# Altium PCB K601-6252双模带屏 VER 1.1 2026 10 16.PcbDoc (part 7 of 12)
Units mm, origin at the board's own origin, x right, y up, seen from the top; angles counter-clockwise.
Board outline 75.02 x 25.73 mm, 2 copper layers (Top Layer, Bottom Layer); 43 components, 67 nets, 219 pads, 157 vias.
Unrouted connection lines stored in the file: 1.
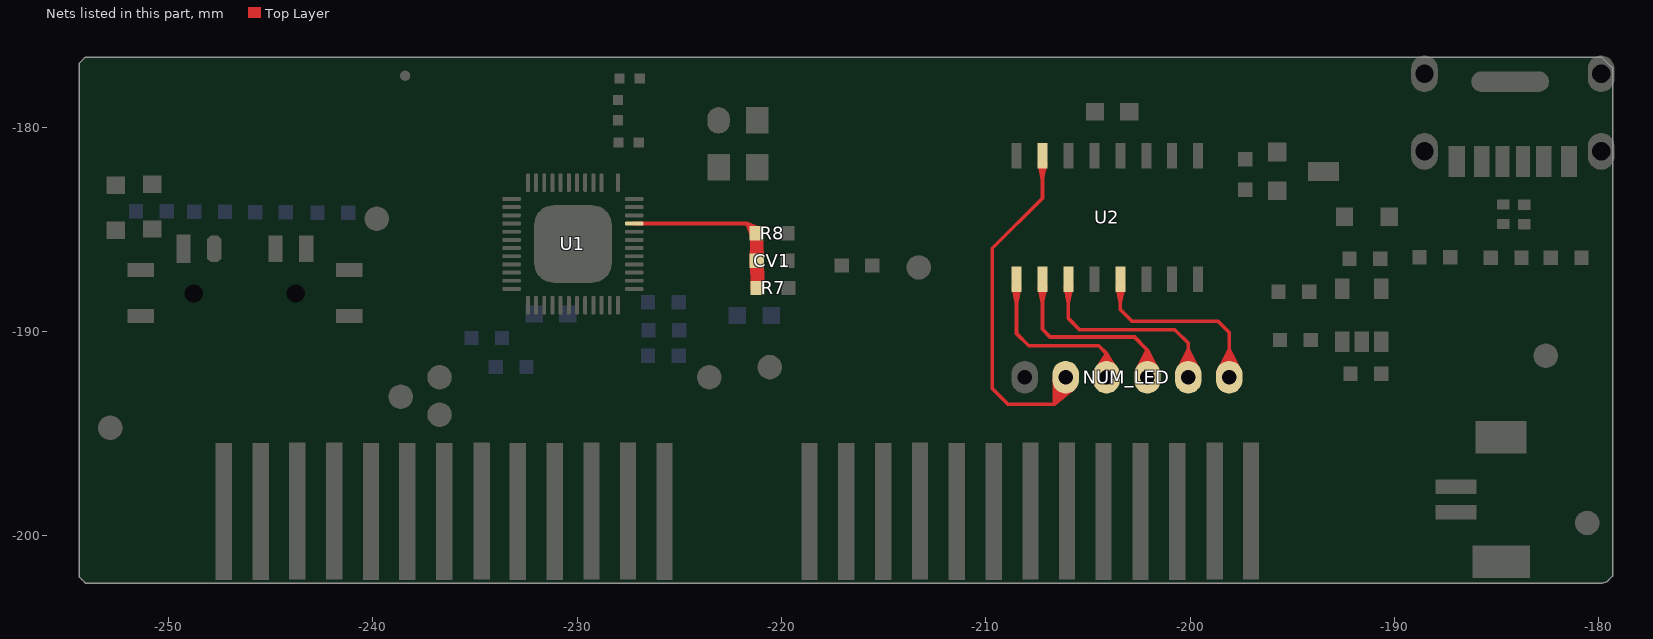
[diagram p7: the nets of this part, all layers, seen from the top]

## Via types
v1: diameter 0.6, hole 0.4, Top Layer to Bottom Layer, tented both sides, 154 vias
v2: diameter 0.6, hole 0.4, Top Layer to Bottom Layer, 3 vias

## Nets (pads, with @x,y where several pads share a name; then routed paths per layer and width w, separated by ;. In a path a pad name is that pad's centre, name@x,y a point inside that pad or via, vN(x,y) a via of type N, cw(c..) or ccw(c..) an arc to the next point about the centre after c; other vN are vias at no path point) (continued)
LED1: (continued)
  Top Layer w0.18: -206.629,-193.542 NUM_LED.5@-206.455,-192.284 ; -206.629,-193.542 NUM_LED.5@-205.917,-192.49 ; -206.629,-193.542 NUM_LED.5@-206.278,-192.321 ; -206.629,-193.542 NUM_LED.5@-206.091,-192.392 ; -206.629,-193.542 NUM_LED.5@-205.649,-192.735 ; -206.629,-193.542 NUM_LED.5@-205.775,-192.602 ; -206.629,-193.542 NUM_LED.5@-206.455,-192.284 ; -206.629,-193.542 NUM_LED.5@-205.917,-192.49 ; -206.629,-193.542 NUM_LED.5@-206.278,-192.321 ; -206.629,-193.542 NUM_LED.5@-206.091,-192.392 ; -206.629,-193.542 NUM_LED.5@-205.649,-192.735 ; -206.629,-193.542 NUM_LED.5@-205.775,-192.602 ; -206.629,-193.542 NUM_LED.5@-206.455,-192.284 ; -206.629,-193.542 NUM_LED.5@-205.917,-192.49 ; -206.629,-193.542 NUM_LED.5@-206.278,-192.321 ; -206.629,-193.542 NUM_LED.5@-206.091,-192.392 ; -206.629,-193.542 NUM_LED.5@-205.649,-192.735 ; -206.629,-193.542 NUM_LED.5@-205.775,-192.602 ; -206.629,-193.542 NUM_LED.5@-206.455,-192.284 ; -206.629,-193.542 NUM_LED.5@-205.917,-192.49 ; -206.629,-193.542 NUM_LED.5@-206.278,-192.321 ; -206.629,-193.542 NUM_LED.5@-206.091,-192.392 ; -206.629,-193.542 NUM_LED.5@-205.649,-192.735 ; -206.629,-193.542 NUM_LED.5@-205.775,-192.602 ; -206.629,-193.542 NUM_LED.5@-206.455,-192.284 ; -206.629,-193.542 NUM_LED.5@-205.917,-192.49 ; -206.629,-193.542 NUM_LED.5@-206.278,-192.321 ; -206.629,-193.542 NUM_LED.5@-206.091,-192.392 ; -206.629,-193.542 NUM_LED.5@-205.649,-192.735 ; -206.629,-193.542 NUM_LED.5@-205.775,-192.602 ; -206.629,-193.542 NUM_LED.5@-206.455,-192.284 ; -206.629,-193.542 NUM_LED.5@-205.917,-192.49 ; -206.629,-193.542 NUM_LED.5@-206.278,-192.321 ; -206.629,-193.542 NUM_LED.5@-206.091,-192.392 ; -206.629,-193.542 NUM_LED.5@-205.649,-192.735 ; -206.629,-193.542 NUM_LED.5@-205.775,-192.602 ; -206.629,-193.542 NUM_LED.5@-206.455,-192.284 ; -206.629,-193.542 NUM_LED.5@-205.917,-192.49 ; -206.629,-193.542 NUM_LED.5@-206.278,-192.321 ; -206.629,-193.542 NUM_LED.5@-206.091,-192.392 ; -206.629,-193.542 NUM_LED.5@-205.649,-192.735 ; -206.629,-193.542 NUM_LED.5@-205.775,-192.602 ; -206.629,-193.542 NUM_LED.5@-206.455,-192.284 ; -206.629,-193.542 NUM_LED.5@-205.917,-192.49 ; -206.629,-193.542 NUM_LED.5@-206.278,-192.321 ; -206.629,-193.542 NUM_LED.5@-206.091,-192.392 ; -206.629,-193.542 NUM_LED.5@-205.649,-192.735 ; -206.629,-193.542 NUM_LED.5@-205.775,-192.602 ; -206.629,-193.542 NUM_LED.5@-206.455,-192.284 ; -206.629,-193.542 NUM_LED.5@-205.917,-192.49 ; -206.629,-193.542 NUM_LED.5@-206.278,-192.321 ; -206.629,-193.542 NUM_LED.5@-206.091,-192.392 ; -206.629,-193.541 NUM_LED.5@-205.649,-192.735 ; -206.629,-193.541 NUM_LED.5@-205.775,-192.602 ; -206.629,-193.541 NUM_LED.5@-206.455,-192.284 ; -206.629,-193.541 NUM_LED.5@-205.917,-192.49 ; -206.629,-193.541 NUM_LED.5@-206.278,-192.321 ; -206.629,-193.541 NUM_LED.5@-206.091,-192.392
LED2: NUM_LED.4 U2.9 | length 84
  Top Layer w0.18: U2.9@-208.495,-187.448 -208.495,-190.103 -207.9,-190.698 -204.475,-190.698 -204.091,-191.082 ; NUM_LED.4@-204.091,-192.242 -204.091,-191.082 ; U2.9@-208.649,-187.843 -208.495,-188.613 ; U2.9@-208.649,-187.843 -208.495,-188.613 ; U2.9@-208.649,-187.843 -208.495,-188.613 ; U2.9@-208.649,-187.843 -208.495,-188.613 ; U2.9@-208.649,-187.843 -208.495,-188.613 ; -208.495,-188.613 U2.9@-208.341,-187.843 ; -208.495,-188.613 U2.9@-208.495,-187.828 ; -208.495,-188.613 U2.9@-208.341,-187.843 ; -208.495,-188.613 U2.9@-208.495,-187.828 ; -208.495,-188.613 U2.9@-208.341,-187.843 ; -208.495,-188.613 U2.9@-208.495,-187.828 ; -208.495,-188.613 U2.9@-208.341,-187.843 ; -208.495,-188.613 U2.9@-208.495,-187.828 ; -208.495,-188.613 U2.9@-208.341,-187.843 ; -208.495,-188.613 U2.9@-208.495,-187.828 ; NUM_LED.4@-204.629,-191.936 -204.091,-191.082 ; NUM_LED.4@-204.629,-191.936 -204.091,-191.082 ; NUM_LED.4@-204.629,-191.936 -204.091,-191.082 ; NUM_LED.4@-204.629,-191.936 -204.091,-191.082 ; NUM_LED.4@-204.629,-191.936 -204.091,-191.082 ; NUM_LED.4@-204.629,-191.936 -204.091,-191.082 ; NUM_LED.4@-204.629,-191.936 -204.091,-191.082 ; NUM_LED.4@-204.629,-191.936 -204.091,-191.082 ; NUM_LED.4@-204.629,-191.936 -204.091,-191.082 ; NUM_LED.4@-204.464,-192.02 -204.091,-191.082 ; NUM_LED.4@-204.464,-192.02 -204.091,-191.082 ; NUM_LED.4@-204.464,-192.02 -204.091,-191.082 ; NUM_LED.4@-204.464,-192.02 -204.091,-191.082 ; NUM_LED.4@-204.464,-192.02 -204.091,-191.082 ; NUM_LED.4@-204.464,-192.02 -204.091,-191.082 ; NUM_LED.4@-204.464,-192.02 -204.091,-191.082 ; NUM_LED.4@-204.464,-192.02 -204.091,-191.082 ; NUM_LED.4@-204.464,-192.02 -204.091,-191.082 ; NUM_LED.4@-204.29,-192.072 -204.091,-191.082 ; NUM_LED.4@-204.29,-192.072 -204.091,-191.082 ; NUM_LED.4@-204.29,-192.072 -204.091,-191.082 ; NUM_LED.4@-204.29,-192.072 -204.091,-191.082 ; NUM_LED.4@-204.29,-192.072 -204.091,-191.082 ; NUM_LED.4@-204.29,-192.072 -204.091,-191.082 ; NUM_LED.4@-204.29,-192.072 -204.091,-191.082 ; NUM_LED.4@-204.29,-192.072 -204.091,-191.082 ; NUM_LED.4@-204.29,-192.072 -204.091,-191.082 ; NUM_LED.4@-204.091,-192.092 -204.091,-191.082 ; NUM_LED.4@-204.091,-192.092 -204.091,-191.082 ; NUM_LED.4@-204.091,-192.092 -204.091,-191.082 ; NUM_LED.4@-204.091,-192.092 -204.091,-191.082 ; NUM_LED.4@-204.091,-192.092 -204.091,-191.082 ; NUM_LED.4@-204.091,-192.092 -204.091,-191.082 ; NUM_LED.4@-204.091,-192.092 -204.091,-191.082 ; NUM_LED.4@-204.091,-192.092 -204.091,-191.082 ; NUM_LED.4@-204.091,-192.092 -204.091,-191.082 ; -204.091,-191.082 NUM_LED.4@-203.553,-191.936 ; -204.091,-191.082 NUM_LED.4@-203.718,-192.02 ; -204.091,-191.082 NUM_LED.4@-203.892,-192.072 ; -204.091,-191.082 NUM_LED.4@-203.553,-191.936 ; -204.091,-191.082 NUM_LED.4@-203.718,-192.02 ; -204.091,-191.082 NUM_LED.4@-203.892,-192.072 ; -204.091,-191.082 NUM_LED.4@-203.553,-191.936 ; -204.091,-191.082 NUM_LED.4@-203.718,-192.02 ; -204.091,-191.082 NUM_LED.4@-203.892,-192.072 ; -204.091,-191.082 NUM_LED.4@-203.553,-191.936 ; -204.091,-191.082 NUM_LED.4@-203.718,-192.02 ; -204.091,-191.082 NUM_LED.4@-203.892,-192.072 ; -204.091,-191.082 NUM_LED.4@-203.553,-191.936 ; -204.091,-191.082 NUM_LED.4@-203.718,-192.02 ; -204.091,-191.082 NUM_LED.4@-203.892,-192.072 ; -204.091,-191.082 NUM_LED.4@-203.553,-191.936 ; -204.091,-191.082 NUM_LED.4@-203.718,-192.02 ; -204.091,-191.082 NUM_LED.4@-203.892,-192.072 ; -204.091,-191.082 NUM_LED.4@-203.553,-191.936 ; -204.091,-191.082 NUM_LED.4@-203.718,-192.02 ; -204.091,-191.082 NUM_LED.4@-203.892,-192.072 ; -204.091,-191.082 NUM_LED.4@-203.553,-191.936 ; -204.091,-191.082 NUM_LED.4@-203.718,-192.02 ; -204.091,-191.082 NUM_LED.4@-203.892,-192.072 ; -204.091,-191.082 NUM_LED.4@-203.553,-191.936 ; -204.091,-191.082 NUM_LED.4@-203.718,-192.02 ; -204.091,-191.082 NUM_LED.4@-203.892,-192.072
LED3: NUM_LED.3 U2.10 | length 95.8
  Top Layer w0.18: U2.10@-207.225,-187.448 -207.225,-189.899 -206.85,-190.274 -202.722,-190.274 -202.091,-190.905 ; NUM_LED.3@-202.091,-192.242 -202.091,-190.905 ; U2.10@-207.379,-187.843 -207.225,-188.613 ; U2.10@-207.379,-187.843 -207.225,-188.613 ; U2.10@-207.379,-187.843 -207.225,-188.613 ; U2.10@-207.379,-187.843 -207.225,-188.613 ; U2.10@-207.379,-187.843 -207.225,-188.613 ; -207.225,-188.613 U2.10@-207.071,-187.843 ; -207.225,-188.613 U2.10@-207.225,-187.828 ; -207.225,-188.613 U2.10@-207.071,-187.843 ; -207.225,-188.613 U2.10@-207.225,-187.828 ; -207.225,-188.613 U2.10@-207.071,-187.843 ; -207.225,-188.613 U2.10@-207.225,-187.828 ; -207.225,-188.613 U2.10@-207.071,-187.843 ; -207.225,-188.613 U2.10@-207.225,-187.828 ; -207.225,-188.613 U2.10@-207.071,-187.843 ; -207.225,-188.613 U2.10@-207.225,-187.828 ; NUM_LED.3@-202.635,-191.959 -202.091,-190.905 ; NUM_LED.3@-202.635,-191.959 -202.091,-190.905 ; NUM_LED.3@-202.635,-191.959 -202.091,-190.905 ; NUM_LED.3@-202.635,-191.959 -202.091,-190.905 ; NUM_LED.3@-202.635,-191.959 -202.091,-190.905 ; NUM_LED.3@-202.635,-191.959 -202.091,-190.905 ; NUM_LED.3@-202.635,-191.959 -202.091,-190.905 ; NUM_LED.3@-202.635,-191.959 -202.091,-190.905 ; NUM_LED.3@-202.635,-191.959 -202.091,-190.905 ; NUM_LED.3@-202.466,-192.031 -202.091,-190.905 ; NUM_LED.3@-202.466,-192.031 -202.091,-190.905 ; NUM_LED.3@-202.466,-192.031 -202.091,-190.905 ; NUM_LED.3@-202.466,-192.031 -202.091,-190.905 ; NUM_LED.3@-202.466,-192.031 -202.091,-190.905 ; NUM_LED.3@-202.466,-192.031 -202.091,-190.905 ; NUM_LED.3@-202.466,-192.031 -202.091,-190.905 ; NUM_LED.3@-202.466,-192.031 -202.091,-190.905 ; NUM_LED.3@-202.466,-192.031 -202.091,-190.905 ; NUM_LED.3@-202.29,-192.075 -202.091,-190.905 ; NUM_LED.3@-202.29,-192.075 -202.091,-190.905 ; NUM_LED.3@-202.29,-192.075 -202.091,-190.905 ; NUM_LED.3@-202.29,-192.075 -202.091,-190.905 ; NUM_LED.3@-202.29,-192.075 -202.091,-190.905 ; NUM_LED.3@-202.29,-192.075 -202.091,-190.905 ; NUM_LED.3@-202.29,-192.075 -202.091,-190.905 ; NUM_LED.3@-202.29,-192.075 -202.091,-190.905 ; NUM_LED.3@-202.29,-192.075 -202.091,-190.905 ; NUM_LED.3@-202.091,-192.092 -202.091,-190.905 ; NUM_LED.3@-202.091,-192.092 -202.091,-190.905 ; NUM_LED.3@-202.091,-192.092 -202.091,-190.905 ; NUM_LED.3@-202.091,-192.092 -202.091,-190.905 ; NUM_LED.3@-202.091,-192.092 -202.091,-190.905 ; NUM_LED.3@-202.091,-192.092 -202.091,-190.905 ; NUM_LED.3@-202.091,-192.092 -202.091,-190.905 ; NUM_LED.3@-202.091,-192.092 -202.091,-190.905 ; NUM_LED.3@-202.091,-192.092 -202.091,-190.905 ; -202.091,-190.905 NUM_LED.3@-201.547,-191.959 ; -202.091,-190.905 NUM_LED.3@-201.716,-192.031 ; -202.091,-190.905 NUM_LED.3@-201.892,-192.075 ; -202.091,-190.905 NUM_LED.3@-201.547,-191.959 ; -202.091,-190.905 NUM_LED.3@-201.716,-192.031 ; -202.091,-190.905 NUM_LED.3@-201.892,-192.075 ; -202.091,-190.905 NUM_LED.3@-201.547,-191.959 ; -202.091,-190.905 NUM_LED.3@-201.716,-192.031 ; -202.091,-190.905 NUM_LED.3@-201.892,-192.075 ; -202.091,-190.905 NUM_LED.3@-201.547,-191.959 ; -202.091,-190.905 NUM_LED.3@-201.716,-192.031 ; -202.091,-190.905 NUM_LED.3@-201.892,-192.075 ; -202.091,-190.905 NUM_LED.3@-201.547,-191.959 ; -202.091,-190.905 NUM_LED.3@-201.716,-192.031 ; -202.091,-190.905 NUM_LED.3@-201.892,-192.075 ; -202.091,-190.905 NUM_LED.3@-201.547,-191.959 ; -202.091,-190.905 NUM_LED.3@-201.716,-192.031 ; -202.091,-190.905 NUM_LED.3@-201.892,-192.075 ; -202.091,-190.905 NUM_LED.3@-201.547,-191.959 ; -202.091,-190.905 NUM_LED.3@-201.716,-192.031 ; -202.091,-190.905 NUM_LED.3@-201.892,-192.075 ; -202.091,-190.905 NUM_LED.3@-201.547,-191.959 ; -202.091,-190.905 NUM_LED.3@-201.716,-192.031 ; -202.091,-190.905 NUM_LED.3@-201.892,-192.075 ; -202.091,-190.905 NUM_LED.3@-201.547,-191.959 ; -202.091,-190.905 NUM_LED.3@-201.716,-192.031 ; -202.091,-190.905 NUM_LED.3@-201.892,-192.075
LED4: NUM_LED.2 U2.11 | length 96.7
  Top Layer w0.18: U2.11@-205.955,-187.448 -205.955,-189.368 -205.408,-189.914 -200.749,-189.914 -200.091,-190.573 NUM_LED.2@-200.091,-192.242 ; U2.11@-206.109,-187.843 -205.955,-188.613 ; U2.11@-206.109,-187.843 -205.955,-188.613 ; U2.11@-206.109,-187.843 -205.955,-188.613 ; U2.11@-206.109,-187.843 -205.955,-188.613 ; U2.11@-206.109,-187.843 -205.955,-188.613 ; -205.955,-188.613 U2.11@-205.801,-187.843 ; -205.955,-188.613 U2.11@-205.955,-187.828 ; -205.955,-188.613 U2.11@-205.801,-187.843 ; -205.955,-188.613 U2.11@-205.955,-187.828 ; -205.955,-188.613 U2.11@-205.801,-187.843 ; -205.955,-188.613 U2.11@-205.955,-187.828 ; -205.955,-188.613 U2.11@-205.801,-187.843 ; -205.955,-188.613 U2.11@-205.955,-187.828 ; -205.955,-188.613 U2.11@-205.801,-187.843 ; -205.955,-188.613 U2.11@-205.955,-187.828 ; NUM_LED.2@-200.635,-191.96 -200.091,-190.902 ; NUM_LED.2@-200.635,-191.96 -200.091,-190.902 ; NUM_LED.2@-200.635,-191.96 -200.091,-190.902 ; NUM_LED.2@-200.635,-191.96 -200.091,-190.902 ; NUM_LED.2@-200.635,-191.96 -200.091,-190.902 ; NUM_LED.2@-200.635,-191.96 -200.091,-190.902 ; NUM_LED.2@-200.635,-191.96 -200.091,-190.902 ; NUM_LED.2@-200.635,-191.96 -200.091,-190.902 ; NUM_LED.2@-200.635,-191.96 -200.091,-190.902 ; NUM_LED.2@-200.466,-192.031 -200.091,-190.902 ; NUM_LED.2@-200.466,-192.031 -200.091,-190.902 ; NUM_LED.2@-200.466,-192.031 -200.091,-190.902 ; NUM_LED.2@-200.466,-192.031 -200.091,-190.902 ; NUM_LED.2@-200.466,-192.031 -200.091,-190.902 ; NUM_LED.2@-200.466,-192.031 -200.091,-190.902 ; NUM_LED.2@-200.466,-192.031 -200.091,-190.902 ; NUM_LED.2@-200.466,-192.031 -200.091,-190.902 ; NUM_LED.2@-200.466,-192.031 -200.091,-190.902 ; NUM_LED.2@-200.29,-192.075 -200.091,-190.902 ; NUM_LED.2@-200.29,-192.075 -200.091,-190.902 ; NUM_LED.2@-200.29,-192.075 -200.091,-190.902 ; NUM_LED.2@-200.29,-192.075 -200.091,-190.902 ; NUM_LED.2@-200.29,-192.075 -200.091,-190.902 ; NUM_LED.2@-200.29,-192.075 -200.091,-190.902 ; NUM_LED.2@-200.29,-192.075 -200.091,-190.902 ; NUM_LED.2@-200.29,-192.075 -200.091,-190.902 ; NUM_LED.2@-200.29,-192.075 -200.091,-190.902 ; NUM_LED.2@-200.091,-192.092 -200.091,-190.902 ; NUM_LED.2@-200.091,-192.092 -200.091,-190.902 ; NUM_LED.2@-200.091,-192.092 -200.091,-190.902 ; NUM_LED.2@-200.091,-192.092 -200.091,-190.902 ; NUM_LED.2@-200.091,-192.092 -200.091,-190.902 ; NUM_LED.2@-200.091,-192.092 -200.091,-190.902 ; NUM_LED.2@-200.091,-192.092 -200.091,-190.902 ; NUM_LED.2@-200.091,-192.092 -200.091,-190.902 ; NUM_LED.2@-200.091,-192.092 -200.091,-190.902 ; -200.091,-190.902 NUM_LED.2@-199.547,-191.96 ; -200.091,-190.902 NUM_LED.2@-199.716,-192.031 ; -200.091,-190.902 NUM_LED.2@-199.892,-192.075 ; -200.091,-190.902 NUM_LED.2@-199.547,-191.96 ; -200.091,-190.902 NUM_LED.2@-199.716,-192.031 ; -200.091,-190.902 NUM_LED.2@-199.892,-192.075 ; -200.091,-190.902 NUM_LED.2@-199.547,-191.96 ; -200.091,-190.902 NUM_LED.2@-199.716,-192.031 ; -200.091,-190.902 NUM_LED.2@-199.892,-192.075 ; -200.091,-190.902 NUM_LED.2@-199.547,-191.96 ; -200.091,-190.902 NUM_LED.2@-199.716,-192.031 ; -200.091,-190.902 NUM_LED.2@-199.892,-192.075 ; -200.091,-190.902 NUM_LED.2@-199.547,-191.96 ; -200.091,-190.902 NUM_LED.2@-199.716,-192.031 ; -200.091,-190.902 NUM_LED.2@-199.892,-192.075 ; -200.091,-190.902 NUM_LED.2@-199.547,-191.96 ; -200.091,-190.902 NUM_LED.2@-199.716,-192.031 ; -200.091,-190.902 NUM_LED.2@-199.892,-192.075 ; -200.091,-190.902 NUM_LED.2@-199.547,-191.96 ; -200.091,-190.902 NUM_LED.2@-199.716,-192.031 ; -200.091,-190.902 NUM_LED.2@-199.892,-192.075 ; -200.091,-190.902 NUM_LED.2@-199.547,-191.96 ; -200.091,-190.902 NUM_LED.2@-199.716,-192.031 ; -200.091,-190.902 NUM_LED.2@-199.892,-192.075 ; -200.091,-190.902 NUM_LED.2@-199.547,-191.96 ; -200.091,-190.902 NUM_LED.2@-199.716,-192.031 ; -200.091,-190.902 NUM_LED.2@-199.892,-192.075
LED5: NUM_LED.1 U2.13 | length 96.2
  Top Layer w0.18: U2.13@-203.415,-187.448 -203.415,-188.933 -202.85,-189.498 -198.641,-189.498 -198.091,-190.048 NUM_LED.1@-198.091,-192.242 ; U2.13@-203.569,-187.843 -203.415,-188.613 ; U2.13@-203.569,-187.843 -203.415,-188.613 ; U2.13@-203.569,-187.843 -203.415,-188.613 ; U2.13@-203.569,-187.843 -203.415,-188.613 ; U2.13@-203.569,-187.843 -203.415,-188.613 ; -203.415,-188.613 U2.13@-203.261,-187.843 ; -203.415,-188.613 U2.13@-203.415,-187.828 ; -203.415,-188.613 U2.13@-203.261,-187.843 ; -203.415,-188.613 U2.13@-203.415,-187.828 ; -203.415,-188.613 U2.13@-203.261,-187.843 ; -203.415,-188.613 U2.13@-203.415,-187.828 ; -203.415,-188.613 U2.13@-203.261,-187.843 ; -203.415,-188.613 U2.13@-203.415,-187.828 ; -203.415,-188.613 U2.13@-203.261,-187.843 ; -203.415,-188.613 U2.13@-203.415,-187.828 ; NUM_LED.1@-198.635,-191.96 -198.091,-190.902 ; NUM_LED.1@-198.635,-191.96 -198.091,-190.902 ; NUM_LED.1@-198.635,-191.96 -198.091,-190.902 ; NUM_LED.1@-198.635,-191.96 -198.091,-190.902 ; NUM_LED.1@-198.635,-191.96 -198.091,-190.902 ; NUM_LED.1@-198.635,-191.96 -198.091,-190.902 ; NUM_LED.1@-198.635,-191.96 -198.091,-190.902 ; NUM_LED.1@-198.635,-191.96 -198.091,-190.902 ; NUM_LED.1@-198.635,-191.96 -198.091,-190.902 ; NUM_LED.1@-198.466,-192.031 -198.091,-190.902 ; NUM_LED.1@-198.466,-192.031 -198.091,-190.902 ; NUM_LED.1@-198.466,-192.031 -198.091,-190.902 ; NUM_LED.1@-198.466,-192.031 -198.091,-190.902 ; NUM_LED.1@-198.466,-192.031 -198.091,-190.902 ; NUM_LED.1@-198.466,-192.031 -198.091,-190.902 ; NUM_LED.1@-198.466,-192.031 -198.091,-190.902 ; NUM_LED.1@-198.466,-192.031 -198.091,-190.902 ; NUM_LED.1@-198.466,-192.031 -198.091,-190.902 ; NUM_LED.1@-198.29,-192.075 -198.091,-190.902 ; NUM_LED.1@-198.29,-192.075 -198.091,-190.902 ; NUM_LED.1@-198.29,-192.075 -198.091,-190.902 ; NUM_LED.1@-198.29,-192.075 -198.091,-190.902 ; NUM_LED.1@-198.29,-192.075 -198.091,-190.902 ; NUM_LED.1@-198.29,-192.075 -198.091,-190.902 ; NUM_LED.1@-198.29,-192.075 -198.091,-190.902 ; NUM_LED.1@-198.29,-192.075 -198.091,-190.902 ; NUM_LED.1@-198.29,-192.075 -198.091,-190.902 ; NUM_LED.1@-198.091,-192.092 -198.091,-190.902 ; NUM_LED.1@-198.091,-192.092 -198.091,-190.902 ; NUM_LED.1@-198.091,-192.092 -198.091,-190.902 ; NUM_LED.1@-198.091,-192.092 -198.091,-190.902 ; NUM_LED.1@-198.091,-192.092 -198.091,-190.902 ; NUM_LED.1@-198.091,-192.092 -198.091,-190.902 ; NUM_LED.1@-198.091,-192.092 -198.091,-190.902 ; NUM_LED.1@-198.091,-192.092 -198.091,-190.902 ; NUM_LED.1@-198.091,-192.092 -198.091,-190.902 ; -198.091,-190.902 NUM_LED.1@-197.547,-191.96 ; -198.091,-190.902 NUM_LED.1@-197.716,-192.031 ; -198.091,-190.902 NUM_LED.1@-197.892,-192.075 ; -198.091,-190.902 NUM_LED.1@-197.547,-191.96 ; -198.091,-190.902 NUM_LED.1@-197.716,-192.031 ; -198.091,-190.902 NUM_LED.1@-197.892,-192.075 ; -198.091,-190.902 NUM_LED.1@-197.547,-191.96 ; -198.091,-190.902 NUM_LED.1@-197.716,-192.031 ; -198.091,-190.902 NUM_LED.1@-197.892,-192.075 ; -198.091,-190.902 NUM_LED.1@-197.547,-191.96 ; -198.091,-190.902 NUM_LED.1@-197.716,-192.031 ; -198.091,-190.902 NUM_LED.1@-197.892,-192.075 ; -198.091,-190.902 NUM_LED.1@-197.547,-191.96 ; -198.091,-190.902 NUM_LED.1@-197.716,-192.031 ; -198.091,-190.902 NUM_LED.1@-197.892,-192.075 ; -198.091,-190.902 NUM_LED.1@-197.547,-191.96 ; -198.091,-190.902 NUM_LED.1@-197.716,-192.031 ; -198.091,-190.902 NUM_LED.1@-197.892,-192.075 ; -198.091,-190.902 NUM_LED.1@-197.547,-191.96 ; -198.091,-190.902 NUM_LED.1@-197.716,-192.031 ; -198.091,-190.902 NUM_LED.1@-197.892,-192.075 ; -198.091,-190.902 NUM_LED.1@-197.547,-191.96 ; -198.091,-190.902 NUM_LED.1@-197.716,-192.031 ; -198.091,-190.902 NUM_LED.1@-197.892,-192.075 ; -198.091,-190.902 NUM_LED.1@-197.547,-191.96 ; -198.091,-190.902 NUM_LED.1@-197.716,-192.031 ; -198.091,-190.902 NUM_LED.1@-197.892,-192.075
"LED/LVD P33": CV1.2 R7.1 R8.1 U1.45 | length 555.4
  Top Layer w0.203: U1.45@-227.2,-184.723 -221.675,-184.723 ; CV1.2@-221.448,-186.563 R8.1@-221.397,-185.355 ; CV1.2@-221.448,-186.558 R8.1@-221.374,-185.416 ; CV1.2@-221.448,-186.553 R8.1@-221.345,-185.506 ; CV1.2@-221.448,-186.551 R7.1@-221.309,-187.581 ; CV1.2@-221.448,-186.547 R7.1@-221.327,-187.646 ; CV1.2@-221.448,-186.545 R7.1@-221.335,-187.671 ; CV1.2@-221.448,-186.538 R7.1@-221.371,-187.764 ; CV1.2@-221.448,-186.534 R7.1@-221.396,-187.905 ; CV1.2@-221.448,-186.529 R8.1@-221.248,-185.511 ; R8.1@-221.448,-185.19 -221.355,-186.17 ; R8.1@-221.448,-185.187 CV1.2@-221.374,-186.329 ; CV1.2@-221.447,-186.572 -221.425,-185.55 ; CV1.2@-221.447,-186.57 -221.41,-185.595 ; R8.1@-221.447,-185.176 -221.41,-186.15 ; CV1.2@-221.444,-186.594 R7.1@-221.121,-187.63 ; CV1.2@-221.444,-186.592 R7.1@-221.123,-187.658 ; CV1.2@-221.445,-186.506 R8.1@-221.152,-185.511 ; CV1.2@-221.44,-186.484 R8.1@-221.055,-185.506 ; CV1.2@-221.44,-186.484 R8.1@-221.026,-185.416 ; CV1.2@-221.44,-186.482 R8.1@-221.004,-185.355 ; R8.1@-221.44,-185.262 CV1.2@-221.026,-186.329 ; R8.1@-221.439,-185.267 -221.046,-186.17 ; CV1.2@-221.437,-186.623 R7.1@-220.967,-187.695 ; R8.1@-221.434,-185.281 -220.991,-186.15 ; CV1.2@-221.432,-186.637 R7.1@-220.94,-187.566 ; CV1.2@-221.432,-186.635 R7.1@-220.938,-187.593 ; CV1.2@-221.432,-186.459 -220.969,-185.59 ; CV1.2@-221.43,-186.641 R7.1@-220.93,-187.54 ; CV1.2@-221.429,-186.645 -220.93,-187.501 ; R7.1@-221.398,-187.894 -221.355,-186.923 ; R7.1@-221.398,-187.892 CV1.2@-221.361,-186.781 ; R7.1@-221.398,-187.891 -221.348,-186.912 ; R7.1@-221.397,-187.85 -221.188,-186.913 ; R7.1@-221.392,-187.815 CV1.2@-220.999,-186.708 ; R7.1@-221.391,-187.813 CV1.2@-221.03,-186.865 ; R7.1@-221.391,-187.811 CV1.2@-221.028,-186.895 ; R7.1@-221.387,-187.797 -220.973,-186.916 ; CV1.2@-220.968,-186.459 -221.431,-185.59 ; R8.1@-220.966,-185.281 -221.41,-186.15 ; CV1.2@-220.963,-186.622 R7.1@-221.386,-187.55 ; R8.1@-220.962,-185.267 -221.355,-186.17 ; CV1.2@-220.96,-186.482 R8.1@-221.397,-185.355 ; CV1.2@-220.96,-186.61 -221.324,-187.52 ; CV1.2@-220.959,-186.607 R7.1@-221.371,-187.764 ; R8.1@-220.96,-185.262 CV1.2@-221.374,-186.329 ; CV1.2@-220.955,-186.506 R8.1@-221.248,-185.511 ; CV1.2@-220.954,-186.515 R7.1@-220.94,-187.566 ; CV1.2@-220.954,-186.512 R7.1@-220.93,-187.54 ; CV1.2@-220.954,-186.51 -220.93,-187.501 ; CV1.2@-220.954,-186.579 R7.1@-221.206,-187.585 ; CV1.2@-220.953,-186.575 -220.969,-185.59 ; CV1.2@-220.953,-186.57 -220.991,-185.595 ; CV1.2@-220.953,-186.527 R7.1@-220.983,-187.658 ; R8.1@-220.953,-185.176 -220.991,-186.15 ; CV1.2@-220.952,-186.563 R8.1@-221.004,-185.355 ; CV1.2@-220.952,-186.558 R8.1@-221.026,-185.416 ; CV1.2@-220.952,-186.556 R7.1@-221.112,-187.577 ; CV1.2@-220.952,-186.553 R8.1@-221.055,-185.506 ; CV1.2@-220.952,-186.531 R7.1@-221.007,-187.584 ; CV1.2@-220.952,-186.529 -221.004,-187.511 ; CV1.2@-220.952,-186.528 R7.1@-220.987,-187.646 ; R8.1@-220.952,-185.19 -221.046,-186.17 ; R8.1@-220.952,-185.187 CV1.2@-221.026,-186.329 ; R7.1@-220.92,-187.779 -221.401,-186.925 ; R7.1@-220.916,-187.79 -221.355,-186.923 ; R7.1@-220.915,-187.792 -221.348,-186.912 ; R7.1@-220.913,-187.799 CV1.2@-221.361,-186.781 ; R7.1@-220.905,-187.831 -221.188,-186.913 ; R7.1@-220.902,-187.878 CV1.2@-220.999,-186.708 ; U1.45@-226.845,-184.723 -226.14,-184.723 ; U1.45@-226.845,-184.723 -226.14,-184.723 ; U1.45@-226.845,-184.723 -226.14,-184.723 ; -221.675,-184.723 R8.1@-221.2,-185.198 ; -221.675,-184.723 R8.1@-221.405,-185.338 ; -221.675,-184.723 R8.1@-221.06,-184.993 ; -221.675,-184.723 R8.1@-221.2,-185.198 ; -221.675,-184.723 R8.1@-221.405,-185.338 ; -221.675,-184.723 R8.1@-221.06,-184.993 ; -221.675,-184.723 R8.1@-221.2,-185.198 ; -221.675,-184.723 R8.1@-221.405,-185.338 ; -221.675,-184.723 R8.1@-221.06,-184.993 ; -221.675,-184.723 R8.1@-221.2,-185.198 ; -221.675,-184.723 R8.1@-221.405,-185.338 ; -221.675,-184.723 R8.1@-221.06,-184.993 ; -221.675,-184.723 R8.1@-221.2,-185.198 ; -221.675,-184.723 R8.1@-221.405,-185.338 ; -221.675,-184.723 R8.1@-221.06,-184.993 ; -221.675,-184.723 R8.1@-221.2,-185.198 ; CV1.2@-221.448,-186.555 -221.355,-185.576 ; CV1.2@-221.448,-186.555 -221.355,-185.576 ; CV1.2@-221.448,-186.555 -221.355,-185.576 ; CV1.2@-221.448,-186.555 -221.351,-185.596 CV1.2@-220.962,-186.477 ; CV1.2@-221.448,-186.555 -221.355,-185.576 ; CV1.2@-221.448,-186.555 -221.355,-185.576 ; CV1.2@-221.448,-186.555 -221.355,-185.576 ; CV1.2@-221.448,-186.555 -221.355,-185.576 ; CV1.2@-221.448,-186.547 -221.326,-187.513 ; CV1.2@-221.448,-186.547 -221.326,-187.513 ; CV1.2@-221.448,-186.547 -221.326,-187.513 ; CV1.2@-221.448,-186.547 -221.326,-187.513 ; CV1.2@-221.448,-186.547 -221.325,-187.502 ; CV1.2@-221.448,-186.547 -221.326,-187.513 ; CV1.2@-221.448,-186.547 -221.326,-187.513 ; CV1.2@-221.448,-186.547 -221.326,-187.513 ; CV1.2@-221.448,-186.547 -221.326,-187.514 ; CV1.2@-221.448,-186.547 -221.326,-187.513 ; CV1.2@-221.448,-186.548 -221.324,-187.52 ; CV1.2@-221.448,-186.532 R7.1@-221.386,-187.55 ; CV1.2@-221.448,-186.532 -221.348,-186.912 ; CV1.2@-221.448,-186.532 -221.348,-186.912 ; CV1.2@-221.448,-186.532 -221.348,-186.912 ; CV1.2@-221.448,-186.567 -221.355,-186.17 ; CV1.2@-221.448,-186.567 -221.355,-186.17 ; CV1.2@-221.448,-186.567 -221.355,-186.17 ; CV1.2@-221.448,-186.527 -221.355,-186.923 ; CV1.2@-221.448,-186.527 -221.355,-186.923 ; CV1.2@-221.448,-186.527 -221.355,-186.923 ; CV1.2@-221.447,-186.525 R8.1@-221.2,-185.198 ; CV1.2@-221.447,-186.525 R8.1@-221.2,-185.198 ; CV1.2@-221.447,-186.525 R8.1@-221.2,-185.198 ; CV1.2@-221.447,-186.525 R8.1@-221.2,-185.198 ; R8.1@-221.448,-185.178 -221.355,-185.576 ; R8.1@-221.448,-185.178 -221.355,-185.576 ; R8.1@-221.448,-185.178 -221.355,-185.576 ; CV1.2@-221.446,-186.58 R7.1@-221.15,-187.873 ; CV1.2@-221.446,-186.58 R7.1@-221.15,-187.873 ; CV1.2@-221.446,-186.58 R7.1@-221.15,-187.873 ; CV1.2@-221.446,-186.58 R7.1@-221.15,-187.873 ; CV1.2@-221.446,-186.58 -221.2,-187.507 ; CV1.2@-221.446,-186.58 -221.2,-187.507 ; CV1.2@-221.446,-186.58 -221.2,-187.507 ; CV1.2@-221.446,-186.58 -221.2,-187.507 ; CV1.2@-221.446,-186.58 -221.2,-187.507 ; CV1.2@-221.446,-186.515 -221.2,-185.588 ; CV1.2@-221.446,-186.515 -221.2,-185.588 ; CV1.2@-221.446,-186.515 -221.2,-185.588 ; CV1.2@-221.446,-186.515 -221.2,-185.588 ; CV1.2@-221.446,-186.515 -221.2,-185.588 ; CV1.2@-221.446,-186.515 -221.2,-185.588 ; CV1.2@-221.446,-186.515 -221.2,-185.588 ; CV1.2@-221.446,-186.515 -221.2,-185.588 ; R8.1@-221.446,-185.23 -221.2,-186.157 ; R8.1@-221.446,-185.23 -221.2,-186.157 ; R8.1@-221.446,-185.23 -221.2,-186.157 ; R8.1@-221.446,-185.23 -221.2,-186.157 ; CV1.2@-221.445,-186.588 -221.169,-187.508 ; CV1.2@-221.445,-186.588 -221.169,-187.508 ; CV1.2@-221.445,-186.588 -221.169,-187.508 ; CV1.2@-221.445,-186.588 -221.169,-187.508 ; CV1.2@-221.445,-186.588 -221.169,-187.507 CV1.2@-220.953,-186.572 ; CV1.2@-221.445,-186.588 -221.169,-187.508 ; CV1.2@-221.445,-186.588 -221.169,-187.508 ; CV1.2@-221.445,-186.588 -221.169,-187.508 ; CV1.2@-221.445,-186.588 -221.169,-187.508 ; CV1.2@-221.445,-186.588 -221.169,-187.508 ; CV1.2@-221.445,-186.589 -221.165,-187.507 ; CV1.2@-221.443,-186.598 -221.41,-186.15 ; CV1.2@-221.443,-186.598 -221.41,-186.15 ; CV1.2@-221.443,-186.598 -221.41,-186.15 ; CV1.2@-221.443,-186.598 R7.1@-221.112,-187.577 ; CV1.2@-221.444,-186.5 -221.401,-186.925 ; CV1.2@-221.444,-186.5 -221.401,-186.925 ; CV1.2@-221.444,-186.5 -221.401,-186.925 ; CV1.2@-221.439,-186.478 -221.046,-185.576 ; CV1.2@-221.439,-186.478 -221.046,-185.576 ; CV1.2@-221.439,-186.478 -221.046,-185.576 ; CV1.2@-221.438,-186.477 -221.049,-185.596 CV1.2@-220.952,-186.555 ; CV1.2@-221.439,-186.478 -221.046,-185.576 ; CV1.2@-221.439,-186.478 -221.046,-185.576 ; CV1.2@-221.439,-186.478 -221.046,-185.576 ; CV1.2@-221.439,-186.478 -221.046,-185.576 ; CV1.2@-221.437,-186.622 R7.1@-220.983,-187.658 ; CV1.2@-221.437,-186.621 R7.1@-221.007,-187.584 ; CV1.2@-221.437,-186.622 R7.1@-220.987,-187.646 ; CV1.2@-221.436,-186.627 -221.005,-187.517 ; CV1.2@-221.436,-186.627 -221.005,-187.517 ; CV1.2@-221.436,-186.627 -221.005,-187.517 ; CV1.2@-221.436,-186.627 -221.005,-187.517 ; CV1.2@-221.436,-186.627 -221.005,-187.517 ; CV1.2@-221.436,-186.627 -221.005,-187.517 ; CV1.2@-221.436,-186.627 -221.005,-187.517 ; CV1.2@-221.436,-186.627 -221.005,-187.518 ; CV1.2@-221.436,-186.627 -221.005,-187.517 ; CV1.2@-221.436,-186.469 -221.2,-186.157 ; CV1.2@-221.436,-186.469 -221.2,-186.157 ; CV1.2@-221.436,-186.469 -221.2,-186.157 ; CV1.2@-221.436,-186.469 -221.2,-186.157 ; CV1.2@-221.436,-186.469 -221.2,-186.157 ; CV1.2@-221.436,-186.469 -221.2,-186.157 ; CV1.2@-221.436,-186.469 -221.2,-186.157 ; CV1.2@-221.436,-186.469 -221.2,-186.157 ; CV1.2@-221.436,-186.469 -221.2,-186.157 ; CV1.2@-221.436,-186.469 -221.2,-186.157 ; CV1.2@-221.436,-186.469 -221.2,-186.157 ; CV1.2@-221.436,-186.469 -221.2,-186.157 ; CV1.2@-221.436,-186.469 -221.2,-186.157 ; CV1.2@-221.436,-186.469 -221.2,-186.157 ; CV1.2@-221.436,-186.469 -221.2,-186.157 ; CV1.2@-221.436,-186.469 -221.2,-186.157 ; CV1.2@-221.436,-186.469 -221.2,-186.157 ; CV1.2@-221.436,-186.469 -221.2,-186.157 ; CV1.2@-221.433,-186.633 -221.2,-186.91 ; CV1.2@-221.433,-186.633 -221.2,-186.91 ; CV1.2@-221.433,-186.633 -221.2,-186.91 ; CV1.2@-221.433,-186.633 -221.2,-186.91 ; CV1.2@-221.433,-186.633 -221.2,-186.91 ; CV1.2@-221.433,-186.633 -221.2,-186.91 ; CV1.2@-221.433,-186.633 -221.2,-186.91 ; CV1.2@-221.433,-186.633 -221.2,-186.91 ; CV1.2@-221.433,-186.633 -221.2,-186.91 ; CV1.2@-221.433,-186.633 -221.2,-186.91 ; CV1.2@-221.433,-186.633 -221.2,-186.91 ; CV1.2@-221.433,-186.633 -221.2,-186.91 ; CV1.2@-221.433,-186.633 -221.2,-186.91 ; CV1.2@-221.433,-186.633 -221.2,-186.91 ; CV1.2@-221.433,-186.633 -221.2,-186.91 ; CV1.2@-221.433,-186.633 -221.2,-186.91 ; CV1.2@-221.433,-186.633 -221.2,-186.91 ; CV1.2@-221.433,-186.633 -221.2,-186.91 ; CV1.2@-221.433,-186.633 -221.2,-186.91 ; CV1.2@-221.433,-186.633 -221.2,-186.91 ; CV1.2@-221.433,-186.633 -221.2,-186.91 ; CV1.2@-221.433,-186.633 -221.2,-186.91 ; CV1.2@-221.433,-186.633 -221.2,-186.91 ; CV1.2@-221.433,-186.633 -221.2,-186.91 ; CV1.2@-221.434,-186.632 -221.2,-186.911 ; CV1.2@-221.434,-186.632 -221.2,-186.911 ; CV1.2@-221.434,-186.632 -221.2,-186.911 ; CV1.2@-221.434,-186.632 -221.2,-186.914 ; CV1.2@-221.434,-186.632 -221.2,-186.914 ; CV1.2@-221.434,-186.632 -221.2,-186.914 ; -221.431,-185.59 -221.447,-186.575 R7.1@-221.206,-187.585 ; -221.431,-185.59 CV1.2@-221.2,-186.548 ; CV1.2@-221.431,-186.639 -221.188,-186.913 ; CV1.2@-221.431,-186.639 -221.188,-186.913 ; CV1.2@-221.431,-186.639 -221.188,-186.913 ; -221.425,-185.55 -220.966,-186.464 -221.41,-185.595 ; -221.425,-185.55 CV1.2@-221.2,-186.548 ; -221.41,-186.15 R8.1@-221.2,-185.198 ; -221.41,-186.15 CV1.2@-221.021,-186.376 ; -221.41,-186.15 CV1.2@-221.2,-186.548 ; -221.41,-186.15 CV1.2@-221.021,-186.376 ; -221.41,-186.15 CV1.2@-221.2,-186.548 ; -221.41,-186.15 CV1.2@-221.021,-186.376 ; -221.41,-186.15 CV1.2@-221.2,-186.548 ; -221.41,-185.595 CV1.2@-221.2,-186.548 ; -221.401,-186.925 R7.1@-221.396,-187.905 ; -221.401,-186.925 R7.1@-221.15,-187.873 ; -221.401,-186.925 CV1.2@-221.024,-186.723 ; -221.401,-186.925 CV1.2@-221.2,-186.548 ; -221.401,-186.925 CV1.2@-221.024,-186.723 ; -221.401,-186.925 CV1.2@-221.2,-186.548 ; -221.401,-186.925 CV1.2@-221.024,-186.723 ; -221.401,-186.925 CV1.2@-221.2,-186.548 ; R7.1@-221.398,-187.853 -221.2,-186.91 ; R7.1@-221.398,-187.853 -221.2,-186.91 ; R7.1@-221.398,-187.853 -221.2,-186.91 ; R7.1@-221.398,-187.853 -221.2,-186.91 ; R7.1@-221.398,-187.853 -221.2,-186.914 ; R7.1@-221.398,-187.853 -221.2,-186.911 ; R7.1@-221.396,-187.907 -221.326,-187.513 ; R7.1@-221.396,-187.907 -221.326,-187.513 ; R7.1@-221.396,-187.907 -221.326,-187.513 ; R7.1@-221.396,-187.905 -220.958,-186.605 R7.1@-221.335,-187.671 ; R7.1@-221.396,-187.905 CV1.2@-221.2,-186.548 ; R8.1@-221.397,-185.355 CV1.2@-221.2,-186.548 ; R7.1@-221.393,-187.821 -221.2,-187.507 ; R7.1@-221.393,-187.821 -221.2,-187.507 ; R7.1@-221.393,-187.821 -221.2,-187.507 ; CV1.2@-221.391,-186.388 -221.046,-186.17 ; CV1.2@-221.391,-186.388 -221.046,-186.17 ; CV1.2@-221.391,-186.388 -221.046,-186.17 ; R8.1@-221.391,-185.357 -221.046,-185.576 ; R8.1@-221.391,-185.357 -221.046,-185.576 ; R8.1@-221.391,-185.357 -221.046,-185.576 ; R7.1@-221.388,-187.8 -221.169,-187.508 ; R7.1@-221.388,-187.8 -221.169,-187.508 ; R7.1@-221.388,-187.8 -221.169,-187.508 ; R7.1@-221.386,-187.55 CV1.2@-221.2,-186.548 ; -221.381,-187.505 CV1.2@-220.964,-186.624 ; -221.381,-187.505 -221.448,-186.533 -221.378,-187.504 ; -221.381,-187.505 CV1.2@-221.2,-186.548 ; CV1.2@-221.379,-186.376 -220.991,-186.15 ; CV1.2@-221.379,-186.376 -220.991,-186.15 ; CV1.2@-221.379,-186.376 -220.991,-186.15 ; -221.378,-187.504 CV1.2@-220.964,-186.624 ; -221.378,-187.504 CV1.2@-221.2,-186.548 ; -221.377,-185.598 -221.448,-186.561 -221.377,-185.598 ; -221.377,-185.598 -220.964,-186.471 -221.377,-185.598 ; CV1.2@-221.374,-186.329 R8.1@-221.2,-185.198 ; R8.1@-221.374,-185.416 -220.96,-186.484 R8.1@-221.345,-185.506 ; R8.1@-221.374,-185.416 CV1.2@-221.2,-186.548 ; R7.1@-221.371,-187.764 CV1.2@-221.2,-186.548 ; CV1.2@-221.365,-186.733 -220.973,-186.916 ; CV1.2@-221.365,-186.733 -220.973,-186.916 ; CV1.2@-221.365,-186.733 -220.973,-186.916 ; CV1.2@-221.361,-186.781 R7.1@-221.15,-187.873 ; -221.355,-186.923 R7.1@-221.15,-187.873 ; -221.355,-186.923 CV1.2@-221.01,-186.708 ; -221.355,-186.923 CV1.2@-221.2,-186.548 ; -221.355,-186.923 CV1.2@-221.01,-186.708 ; -221.355,-186.923 CV1.2@-221.2,-186.548 ; -221.355,-186.923 CV1.2@-221.01,-186.708 ; -221.355,-186.923 CV1.2@-221.2,-186.548 ; -221.355,-186.17 R8.1@-221.2,-185.198 ; -221.355,-186.17 CV1.2@-221.01,-186.388 ; -221.355,-186.17 CV1.2@-221.2,-186.548 ; -221.355,-186.17 CV1.2@-221.01,-186.388 ; -221.355,-186.17 CV1.2@-221.2,-186.548 ; -221.355,-186.17 CV1.2@-221.01,-186.388 ; -221.355,-186.17 CV1.2@-221.2,-186.548 ; -221.355,-185.576 CV1.2@-220.962,-186.478 ; -221.355,-185.576 CV1.2@-221.2,-186.548 ; -221.355,-185.576 R8.1@-221.01,-185.357 ; -221.355,-185.576 R8.1@-221.2,-185.198 ; -221.355,-185.576 R8.1@-221.01,-185.357 ; -221.355,-185.576 R8.1@-221.2,-185.198 ; -221.355,-185.576 R8.1@-221.01,-185.357 ; -221.355,-185.576 R8.1@-221.2,-185.198 ; -221.355,-185.576 CV1.2@-220.962,-186.478 ; -221.355,-185.576 CV1.2@-221.2,-186.548 ; -221.355,-185.576 CV1.2@-220.962,-186.478 ; -221.355,-185.576 CV1.2@-221.2,-186.548 ; -221.355,-185.576 CV1.2@-220.962,-186.478 ; -221.355,-185.576 CV1.2@-221.2,-186.548 ; -221.355,-185.576 CV1.2@-220.962,-186.478 ; -221.355,-185.576 CV1.2@-221.2,-186.548 ; -221.355,-185.576 CV1.2@-220.962,-186.478 ; -221.355,-185.576 CV1.2@-221.2,-186.548 ; -221.355,-185.576 CV1.2@-220.962,-186.478 ; -221.355,-185.576 CV1.2@-221.2,-186.548 ; -221.348,-186.912 R7.1@-221.15,-187.873 ; -221.348,-186.912 CV1.2@-221.011,-186.709 ; -221.348,-186.912 CV1.2@-221.2,-186.548 ; -221.348,-186.912 CV1.2@-221.011,-186.709 ; -221.348,-186.912 CV1.2@-221.2,-186.548 ; -221.348,-186.912 CV1.2@-221.011,-186.709 ; -221.348,-186.912 CV1.2@-221.2,-186.548 ; R8.1@-221.345,-185.506 CV1.2@-221.2,-186.548 ; -221.344,-187.5 -220.961,-186.616 -221.344,-187.5 ; -221.344,-187.5 -221.448,-186.542 -221.344,-187.5 ; -221.344,-187.5 CV1.2@-221.2,-186.548 ; -221.344,-187.5 CV1.2@-221.2,-186.548 ; R7.1@-221.337,-187.709 -221.005,-187.517 ; R7.1@-221.337,-187.709 -221.005,-187.517 ; R7.1@-221.337,-187.709 -221.005,-187.517 ; R7.1@-221.335,-187.671 CV1.2@-221.2,-186.548 ; R7.1@-221.327,-187.646 -220.958,-186.604 R7.1@-221.309,-187.581 ; R7.1@-221.327,-187.646 CV1.2@-221.2,-186.548 ; -221.326,-187.514 CV1.2@-220.96,-186.611 ; -221.326,-187.514 CV1.2@-221.2,-186.548 ; -221.326,-187.513 CV1.2@-220.96,-186.611 ; -221.326,-187.513 CV1.2@-221.2,-186.548 ; -221.326,-187.513 R7.1@-220.972,-187.699 ; -221.326,-187.513 R7.1@-221.15,-187.873 ; -221.326,-187.513 R7.1@-220.972,-187.699 ; -221.326,-187.513 R7.1@-221.15,-187.873 ; -221.326,-187.513 R7.1@-220.972,-187.699 ; -221.326,-187.513 R7.1@-221.15,-187.873 ; -221.326,-187.513 CV1.2@-220.96,-186.611 ; -221.326,-187.513 CV1.2@-221.2,-186.548 ; -221.326,-187.513 CV1.2@-220.96,-186.611 ; -221.326,-187.513 CV1.2@-221.2,-186.548 ; -221.326,-187.513 CV1.2@-220.96,-186.611 ; -221.326,-187.513 CV1.2@-221.2,-186.548 ; -221.326,-187.513 CV1.2@-220.96,-186.611 ; -221.326,-187.513 CV1.2@-221.2,-186.548 ; -221.326,-187.513 CV1.2@-220.96,-186.611 ; -221.326,-187.513 CV1.2@-221.2,-186.548 ; -221.326,-187.513 CV1.2@-220.96,-186.611 ; -221.326,-187.513 CV1.2@-221.2,-186.548 ; -221.326,-187.513 CV1.2@-220.96,-186.611 ; -221.326,-187.513 CV1.2@-221.2,-186.548 ; -221.325,-187.502 CV1.2@-220.96,-186.611 ; -221.325,-187.502 CV1.2@-221.2,-186.548 ; -221.324,-187.52 CV1.2@-221.2,-186.548 ; R7.1@-221.309,-187.581 CV1.2@-221.2,-186.548 ; R8.1@-221.248,-185.511 CV1.2@-221.2,-186.548 ; R7.1@-221.206,-187.585 CV1.2@-221.2,-186.548 ; -221.2,-187.507 CV1.2@-220.954,-186.58 ; -221.2,-187.507 CV1.2@-221.2,-186.548 ; -221.2,-187.507 R7.1@-220.93,-187.758 ; -221.2,-187.507 R7.1@-221.15,-187.873 ; -221.2,-187.507 R7.1@-220.93,-187.758 ; -221.2,-187.507 R7.1@-221.15,-187.873 ; -221.2,-187.507 R7.1@-220.93,-187.758 ; -221.2,-187.507 R7.1@-221.15,-187.873 ; -221.2,-187.507 CV1.2@-220.954,-186.58 ; -221.2,-187.507 CV1.2@-221.2,-186.548 ; -221.2,-187.507 CV1.2@-220.954,-186.58 ; -221.2,-187.507 CV1.2@-221.2,-186.548 ; -221.2,-187.507 CV1.2@-220.954,-186.58 ; -221.2,-187.507 CV1.2@-221.2,-186.548 ; -221.2,-187.507 CV1.2@-220.954,-186.58 ; -221.2,-187.507 CV1.2@-221.2,-186.548 ; -221.2,-186.914 R7.1@-220.906,-187.828 ; -221.2,-186.914 R7.1@-221.15,-187.873 ; -221.2,-186.914 CV1.2@-220.966,-186.632 ; -221.2,-186.914 CV1.2@-221.2,-186.548 ; -221.2,-186.914 CV1.2@-220.966,-186.632 ; -221.2,-186.914 CV1.2@-221.2,-186.548 ; -221.2,-186.914 CV1.2@-220.966,-186.632 ; -221.2,-186.914 CV1.2@-221.2,-186.548 ; -221.2,-186.911 R7.1@-220.906,-187.828 ; -221.2,-186.911 R7.1@-221.15,-187.873 ; -221.2,-186.911 CV1.2@-220.967,-186.632 ; -221.2,-186.911 CV1.2@-221.2,-186.548 ; -221.2,-186.911 CV1.2@-220.967,-186.632 ; -221.2,-186.911 CV1.2@-221.2,-186.548 ; -221.2,-186.911 CV1.2@-220.967,-186.632 ; -221.2,-186.911 CV1.2@-221.2,-186.548 ; -221.2,-186.91 R7.1@-220.906,-187.828 ; -221.2,-186.91 R7.1@-221.15,-187.873 ; -221.2,-186.91 CV1.2@-220.967,-186.633 ; -221.2,-186.91 CV1.2@-221.2,-186.548 ; -221.2,-186.91 CV1.2@-220.967,-186.633 ; -221.2,-186.91 CV1.2@-221.2,-186.548 ; -221.2,-186.91 CV1.2@-220.967,-186.633 ; -221.2,-186.91 CV1.2@-221.2,-186.548 ; -221.2,-186.91 R7.1@-220.906,-187.828 ; -221.2,-186.91 R7.1@-221.15,-187.873 ; -221.2,-186.91 R7.1@-220.906,-187.828 ; -221.2,-186.91 R7.1@-221.15,-187.873 ; -221.2,-186.91 R7.1@-220.906,-187.828 ; -221.2,-186.91 R7.1@-221.15,-187.873 ; -221.2,-186.91 CV1.2@-220.967,-186.633 ; -221.2,-186.91 CV1.2@-221.2,-186.548 ; -221.2,-186.91 CV1.2@-220.967,-186.633 ; -221.2,-186.91 CV1.2@-221.2,-186.548 ; -221.2,-186.91 CV1.2@-220.967,-186.633 ; -221.2,-186.91 CV1.2@-220.967,-186.633 ; -221.2,-186.91 CV1.2@-221.2,-186.548 ; -221.2,-186.91 CV1.2@-220.967,-186.633 ; -221.2,-186.91 CV1.2@-221.2,-186.548 ; -221.2,-186.91 CV1.2@-220.967,-186.633 ; -221.2,-186.91 CV1.2@-220.967,-186.633 ; -221.2,-186.91 CV1.2@-221.2,-186.548 ; -221.2,-186.91 CV1.2@-220.967,-186.633 ; -221.2,-186.91 CV1.2@-221.2,-186.548 ; -221.2,-186.91 CV1.2@-220.967,-186.633 ; -221.2,-186.91 CV1.2@-220.967,-186.633 ; -221.2,-186.91 CV1.2@-221.2,-186.548 ; -221.2,-186.91 CV1.2@-220.967,-186.633 ; -221.2,-186.91 CV1.2@-221.2,-186.548 ; -221.2,-186.91 CV1.2@-220.967,-186.633 ; -221.2,-186.91 CV1.2@-221.2,-186.548 ; -221.2,-186.91 CV1.2@-220.967,-186.633 ; -221.2,-186.91 CV1.2@-221.2,-186.548 ; -221.2,-186.91 CV1.2@-220.967,-186.633 ; -221.2,-186.91 CV1.2@-221.2,-186.548 ; -221.2,-186.91 CV1.2@-220.967,-186.633 ; -221.2,-186.91 CV1.2@-221.2,-186.548 ; -221.2,-186.91 CV1.2@-220.967,-186.633 ; -221.2,-186.91 CV1.2@-221.2,-186.548 ; -221.2,-186.91 CV1.2@-220.967,-186.633 ; -221.2,-186.91 CV1.2@-221.2,-186.548 ; -221.2,-186.91 CV1.2@-220.967,-186.633 ; -221.2,-186.91 CV1.2@-221.2,-186.548 ; -221.2,-186.91 CV1.2@-220.967,-186.633 ; -221.2,-186.91 CV1.2@-221.2,-186.548 ; -221.2,-186.91 CV1.2@-220.967,-186.633 ; -221.2,-186.91 CV1.2@-221.2,-186.548 ; -221.2,-186.91 CV1.2@-220.967,-186.633 ; -221.2,-186.91 CV1.2@-221.2,-186.548 ; CV1.2@-221.2,-186.548 -221.046,-185.576 ; CV1.2@-221.2,-186.548 -221.2,-186.157 ; CV1.2@-221.2,-186.548 -221.2,-186.157 ; CV1.2@-221.2,-186.548 -221.005,-187.517 ; CV1.2@-221.2,-186.548 -221.169,-187.508 ; CV1.2@-221.2,-186.548 -220.953,-185.22 CV1.2@-221.2,-186.548 ; CV1.2@-221.2,-186.548 -221.447,-185.22 CV1.2@-221.2,-186.548 ; CV1.2@-221.2,-186.548 R8.1@-221.2,-185.198 ; CV1.2@-221.2,-186.548 R8.1@-221.2,-185.198 ; CV1.2@-221.2,-186.548 -221.398,-187.859 CV1.2@-221.2,-186.548 ; CV1.2@-221.2,-186.548 -220.904,-187.84 CV1.2@-221.2,-186.548 ; CV1.2@-221.2,-186.548 R7.1@-221.15,-187.873 ; CV1.2@-221.2,-186.548 R7.1@-221.15,-187.873 ; CV1.2@-221.2,-186.548 -221.2,-185.588 ; CV1.2@-221.2,-186.548 -221.2,-185.588 ; CV1.2@-221.2,-186.548 -221.046,-185.576 ; CV1.2@-221.2,-186.548 -221.046,-185.576 ; CV1.2@-221.2,-186.548 -221.2,-186.157 ; CV1.2@-221.2,-186.548 -221.2,-186.157 ; CV1.2@-221.2,-186.548 -221.2,-186.157 ; CV1.2@-221.2,-186.548 -221.2,-186.157 ; CV1.2@-221.2,-186.548 -221.046,-185.576 ; CV1.2@-221.2,-186.548 -221.2,-186.157 ; CV1.2@-221.2,-186.548 -221.2,-186.157 ; CV1.2@-221.2,-186.548 -221.005,-187.517 ; CV1.2@-221.2,-186.548 -221.169,-187.508 ; CV1.2@-221.2,-186.548 -221.005,-187.517 ; CV1.2@-221.2,-186.548 -221.005,-187.517 ; CV1.2@-221.2,-186.548 -221.169,-187.508 ; CV1.2@-221.2,-186.548 -221.169,-187.508 ; CV1.2@-221.2,-186.548 R8.1@-221.026,-185.416 ; CV1.2@-221.2,-186.548 R8.1@-221.2,-185.198 ; CV1.2@-221.2,-186.548 -220.991,-185.595 ; CV1.2@-221.2,-186.548 -221.046,-186.17 ; CV1.2@-221.2,-186.548 -221.046,-186.17 ; CV1.2@-221.2,-186.548 -221.046,-186.17 ; CV1.2@-221.2,-186.548 R8.1@-221.2,-185.198 ; CV1.2@-221.2,-186.548 R8.1@-221.055,-185.506 ; CV1.2@-221.2,-186.548 -220.969,-185.59 ; CV1.2@-221.2,-186.548 -220.991,-186.15 ; CV1.2@-221.2,-186.548 -220.991,-186.15 ; CV1.2@-221.2,-186.548 -220.991,-186.15 ; CV1.2@-221.2,-186.548 R8.1@-221.2,-185.198 ; CV1.2@-221.2,-186.548 R8.1@-221.004,-185.355 ; CV1.2@-221.2,-186.548 R8.1@-221.2,-185.198 ; CV1.2@-221.2,-186.548 -220.976,-185.55 ; CV1.2@-221.2,-186.548 R8.1@-221.152,-185.511 ; CV1.2@-221.2,-186.548 -221.046,-185.576 ; CV1.2@-221.2,-186.548 -221.2,-186.157 ; CV1.2@-221.2,-186.548 -221.2,-186.157 ; CV1.2@-221.2,-186.548 -221.046,-185.576 ; CV1.2@-221.2,-186.548 -221.2,-186.157 ; CV1.2@-221.2,-186.548 -221.2,-186.157 ; CV1.2@-221.2,-186.548 -221.2,-185.588 ; CV1.2@-221.2,-186.548 -221.2,-186.157 ; CV1.2@-221.2,-186.548 -221.046,-185.576 ; CV1.2@-221.2,-186.548 -221.2,-186.157 ; CV1.2@-221.2,-186.548 -221.2,-186.157 ; CV1.2@-221.2,-186.548 -221.2,-185.588 ; CV1.2@-221.2,-186.548 -221.2,-186.157 ; CV1.2@-221.2,-186.548 -221.005,-187.517 ; CV1.2@-221.2,-186.548 -221.169,-187.508 ; CV1.2@-221.2,-186.548 -221.005,-187.517 ; CV1.2@-221.2,-186.548 -221.169,-187.508 ; CV1.2@-221.2,-186.548 -221.005,-187.517 ; CV1.2@-221.2,-186.548 -221.169,-187.508 ; CV1.2@-221.2,-186.548 -221.005,-187.518 ; CV1.2@-221.2,-186.548 -221.169,-187.508 ; CV1.2@-221.2,-186.548 R7.1@-220.94,-187.566 ; CV1.2@-221.2,-186.548 R7.1@-221.121,-187.63 ; CV1.2@-221.2,-186.548 R7.1@-220.983,-187.658 ; CV1.2@-221.2,-186.548 R7.1@-221.15,-187.873 ; CV1.2@-221.2,-186.548 -221.005,-187.517 ; CV1.2@-221.2,-186.548 -221.169,-187.508 ; CV1.2@-221.2,-186.548 R7.1@-220.93,-187.54 ; CV1.2@-221.2,-186.548 R7.1@-221.112,-187.577 ; CV1.2@-221.2,-186.548 R7.1@-220.967,-187.695 ; CV1.2@-221.2,-186.548 R7.1@-221.15,-187.873 ; CV1.2@-221.2,-186.548 -220.973,-186.916 ; CV1.2@-221.2,-186.548 -220.93,-187.501 ; CV1.2@-221.2,-186.548 -220.973,-186.916 ; CV1.2@-221.2,-186.548 -220.973,-186.916 ; CV1.2@-221.2,-186.548 R7.1@-221.15,-187.873 ; CV1.2@-221.2,-186.548 R7.1@-221.007,-187.584 ; CV1.2@-221.2,-186.548 R7.1@-220.938,-187.593 ; CV1.2@-221.2,-186.548 R7.1@-221.123,-187.658 ; CV1.2@-221.2,-186.548 R7.1@-220.987,-187.646 ; CV1.2@-221.2,-186.548 R7.1@-221.15,-187.873 ; CV1.2@-221.2,-186.548 -221.188,-186.913 ; CV1.2@-221.2,-186.548 -221.004,-187.511 ; CV1.2@-221.2,-186.548 -221.188,-186.913 ; CV1.2@-221.2,-186.548 -221.165,-187.507 ; CV1.2@-221.2,-186.548 -221.188,-186.913 ; -221.2,-186.157 R8.1@-220.954,-185.23 ; -221.2,-186.157 CV1.2@-220.965,-186.469 ; -221.2,-186.157 CV1.2@-220.965,-186.469 ; -221.2,-186.157 R8.1@-220.954,-185.23 ; -221.2,-186.157 R8.1@-220.954,-185.23 ; -221.2,-186.157 R8.1@-221.2,-185.198 ; -221.2,-186.157 R8.1@-220.954,-185.23 ; -221.2,-186.157 R8.1@-221.2,-185.198 ; -221.2,-186.157 CV1.2@-220.965,-186.469 ; -221.2,-186.157 CV1.2@-220.965,-186.469 ; -221.2,-186.157 CV1.2@-220.965,-186.469 ; -221.2,-186.157 CV1.2@-220.965,-186.469 ; -221.2,-186.157 CV1.2@-220.965,-186.469 ; -221.2,-186.157 CV1.2@-220.965,-186.469 ; -221.2,-186.157 CV1.2@-220.965,-186.469 ; -221.2,-186.157 CV1.2@-220.965,-186.469 ; -221.2,-186.157 CV1.2@-220.965,-186.469 ; -221.2,-186.157 CV1.2@-220.965,-186.469 ; -221.2,-186.157 CV1.2@-220.965,-186.469 ; -221.2,-186.157 CV1.2@-220.965,-186.469 ; -221.2,-186.157 CV1.2@-220.965,-186.469 ; -221.2,-186.157 CV1.2@-220.965,-186.469 ; -221.2,-186.157 CV1.2@-220.965,-186.469 ; -221.2,-186.157 CV1.2@-220.965,-186.469 ; -221.2,-185.588 CV1.2@-220.954,-186.515 ; -221.2,-185.588 -220.965,-185.277 -221.2,-185.588 ; -221.2,-185.588 -221.436,-185.277 -221.2,-185.588 ; -221.2,-185.588 R8.1@-221.2,-185.198 ; -221.2,-185.588 R8.1@-221.2,-185.198 ; -221.2,-185.588 CV1.2@-220.954,-186.515 ; -221.2,-185.588 CV1.2@-220.954,-186.515 ; -221.2,-185.588 CV1.2@-220.954,-186.515 ; -221.2,-185.588 CV1.2@-220.954,-186.515 ; -221.2,-185.588 CV1.2@-220.954,-186.515 ; -221.2,-185.588 CV1.2@-220.954,-186.515 ; -221.2,-185.588 CV1.2@-220.954,-186.515 ; R8.1@-221.2,-185.198 -221.2,-187.823 R7.1@-221.15,-187.873 ; R8.1@-221.2,-185.198 -221.046,-186.17 ; R8.1@-221.2,-185.198 -221.046,-185.576 ; R8.1@-221.2,-185.198 -220.991,-186.15 ; R8.1@-221.2,-185.198 -221.046,-185.576 ; R8.1@-221.2,-185.198 -221.046,-185.576 ; R8.1@-221.2,-185.198 CV1.2@-221.026,-186.329 ; R8.1@-221.2,-185.198 CV1.2@-220.953,-186.525 ; R8.1@-221.2,-185.198 CV1.2@-220.953,-186.525 ; R8.1@-221.2,-185.198 CV1.2@-220.953,-186.525 ; R8.1@-221.2,-185.198 CV1.2@-220.953,-186.525 ; -221.188,-186.913 R7.1@-221.15,-187.873 ; -221.188,-186.913 CV1.2@-220.964,-186.624 ; -221.188,-186.913 CV1.2@-220.964,-186.624 ; -221.188,-186.913 CV1.2@-220.964,-186.624 ; -221.169,-187.508 CV1.2@-220.953,-186.572 ; -221.169,-187.508 R7.1@-220.921,-187.776 ; -221.169,-187.508 R7.1@-221.15,-187.873 ; -221.169,-187.508 R7.1@-220.921,-187.776 ; -221.169,-187.508 R7.1@-221.15,-187.873 ; -221.169,-187.508 R7.1@-220.921,-187.776 ; -221.169,-187.508 R7.1@-221.15,-187.873 ; -221.169,-187.508 CV1.2@-220.953,-186.572 ; -221.169,-187.508 CV1.2@-220.953,-186.572 ; -221.169,-187.508 CV1.2@-220.953,-186.572 ; -221.169,-187.508 CV1.2@-220.953,-186.572 ; -221.169,-187.508 CV1.2@-220.953,-186.572 ; -221.169,-187.508 CV1.2@-220.953,-186.572 ; -221.169,-187.508 CV1.2@-220.953,-186.572 ; -221.169,-187.508 CV1.2@-220.953,-186.572 ; -221.165,-187.507 CV1.2@-220.953,-186.571 ; -221.164,-187.507 CV1.2@-220.953,-186.57 ; -221.164,-187.507 -221.445,-186.589 -221.164,-187.507 ; -221.164,-187.507 CV1.2@-220.953,-186.57 ; R8.1@-221.152,-185.511 CV1.2@-220.952,-186.529 ; R7.1@-221.15,-187.873 CV1.2@-221.03,-186.865 ; R7.1@-221.15,-187.873 CV1.2@-220.999,-186.708 ; R7.1@-221.15,-187.873 -220.973,-186.916 ; R7.1@-221.15,-187.873 -221.005,-187.517 ; R7.1@-221.15,-187.873 -221.005,-187.517 ; R7.1@-221.15,-187.873 -221.005,-187.517 ; R7.1@-221.15,-187.873 CV1.2@-221.028,-186.895 ; R7.1@-221.15,-187.873 CV1.2@-220.952,-186.562 ; R7.1@-221.15,-187.873 CV1.2@-220.952,-186.562 ; R7.1@-221.15,-187.873 CV1.2@-220.952,-186.562 ; R7.1@-221.15,-187.873 CV1.2@-220.952,-186.562 ; R7.1@-221.123,-187.658 -220.952,-186.558 R7.1@-221.121,-187.63 ; -221.046,-186.17 CV1.2@-220.952,-186.567 ; -221.046,-186.17 CV1.2@-220.952,-186.567 ; -221.046,-186.17 CV1.2@-220.952,-186.567 ; -221.046,-185.576 CV1.2@-220.952,-186.555 ; -221.046,-185.576 R8.1@-220.952,-185.178 ; -221.046,-185.576 R8.1@-220.952,-185.178 ; -221.046,-185.576 R8.1@-220.952,-185.178 ; -221.046,-185.576 CV1.2@-220.952,-186.555 ; -221.046,-185.576 CV1.2@-220.952,-186.555 ; -221.046,-185.576 CV1.2@-220.952,-186.555 ; -221.046,-185.576 CV1.2@-220.952,-186.555 ; -221.046,-185.576 CV1.2@-220.952,-186.555 ; -221.046,-185.576 CV1.2@-220.952,-186.555 ; CV1.2@-221.03,-186.865 -220.902,-187.872 CV1.2@-221.028,-186.895 ; -221.023,-185.598 -221.436,-186.471 -221.023,-185.598 ; -221.023,-185.598 CV1.2@-220.952,-186.561 ; -221.023,-185.598 CV1.2@-220.952,-186.561 ; -221.005,-187.518 CV1.2@-220.952,-186.53 ; -221.005,-187.517 CV1.2@-220.952,-186.53 ; -221.005,-187.517 CV1.2@-220.952,-186.53 ; -221.005,-187.517 R7.1@-220.902,-187.887 ; -221.005,-187.517 R7.1@-220.902,-187.887 ; -221.005,-187.517 R7.1@-220.902,-187.887 ; -221.005,-187.517 CV1.2@-220.952,-186.53 ; -221.005,-187.517 CV1.2@-220.952,-186.53 ; -221.005,-187.517 CV1.2@-220.952,-186.53 ; -221.005,-187.517 CV1.2@-220.952,-186.53 ; -221.005,-187.517 CV1.2@-220.952,-186.53 ; -221.005,-187.517 CV1.2@-220.952,-186.53 ; -221.004,-187.511 -221.435,-186.628 -221.01,-187.495 CV1.2@-220.952,-186.53 ; -220.991,-186.15 CV1.2@-220.957,-186.598 ; -220.991,-186.15 CV1.2@-220.957,-186.598 ; -220.991,-186.15 CV1.2@-220.957,-186.598 ; -220.991,-185.595 -221.434,-186.464 -220.976,-185.55 ; -220.984,-187.492 -220.953,-186.524 -220.984,-187.492 ; -220.984,-187.492 -221.433,-186.634 -220.984,-187.492 ; -220.976,-185.55 CV1.2@-220.953,-186.572 ; -220.973,-186.916 R7.1@-220.902,-187.886 ; -220.973,-186.916 CV1.2@-220.96,-186.483 ; -220.973,-186.916 CV1.2@-220.96,-186.483 ; -220.973,-186.916 CV1.2@-220.96,-186.483 ; R7.1@-220.967,-187.695 CV1.2@-220.953,-186.524 ; CV1.2@-220.954,-186.515 R7.1@-220.938,-187.593